# Altium PCB PCB1.PcbDoc
Units mil, origin at the board's own origin, x right, y up, seen from the top; angles counter-clockwise.
Board outline 6000 x 4000 mil, 2 copper layers (Top Layer, Bottom Layer); 70 components, 48 nets, 257 pads, 4 vias.
Unrouted connection lines stored in the file: 175.
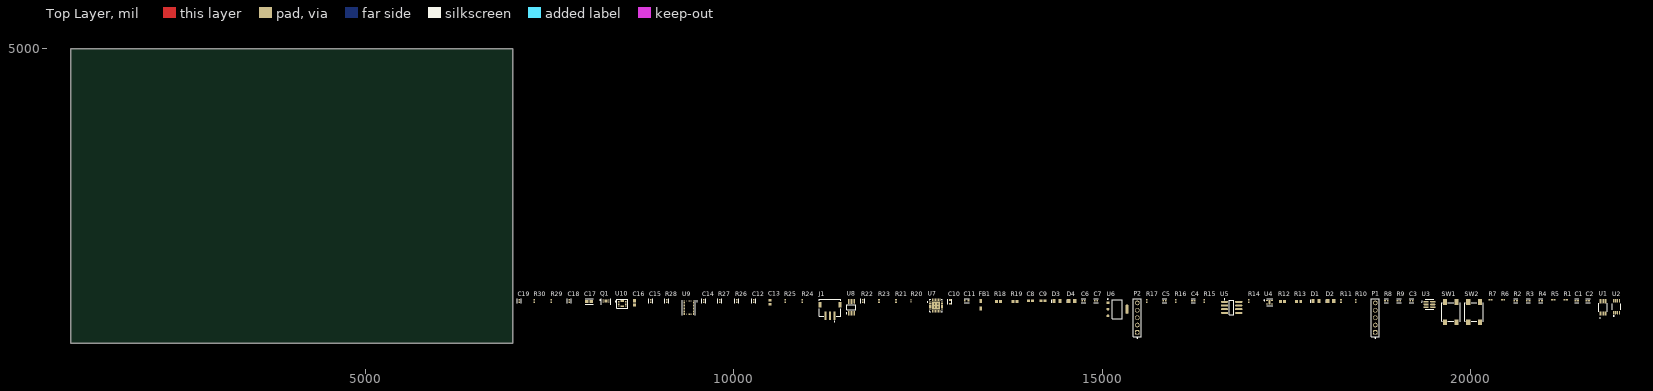
[diagram p0: Top Layer view]
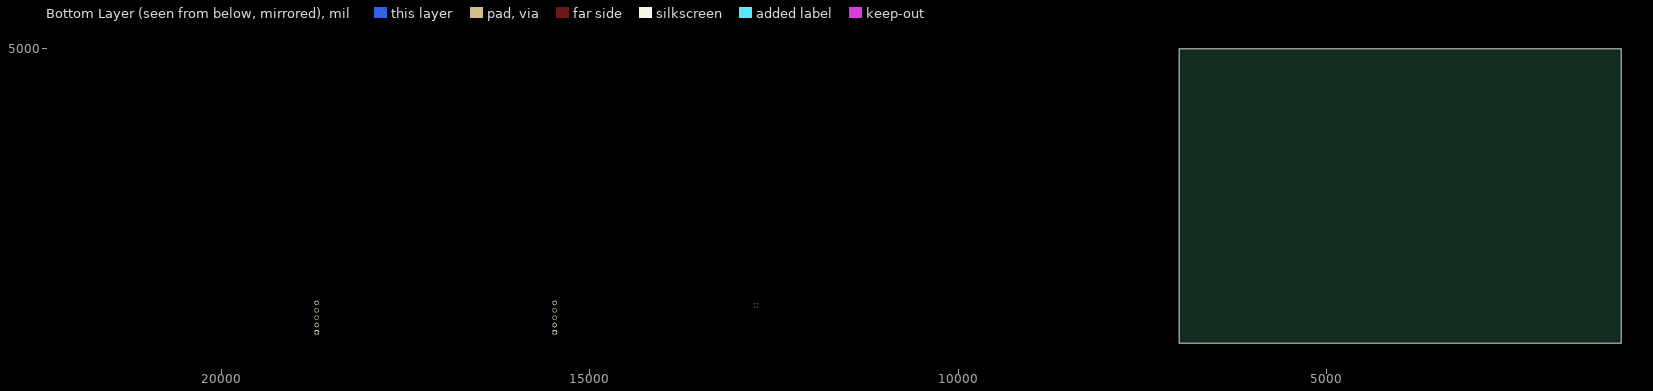
[diagram p1: Bottom Layer view, seen from below]

## Layer stack, top to bottom
Top Solder: solder mask 0.4, Solder Resist, Dk 3.5
Top Layer: signal copper 1.4
Dielectric 1: dielectric 12.6, FR-4, Dk 4.8
Bottom Layer: signal copper 1.4
Bottom Solder: solder mask 0.4, Solder Resist, Dk 3.5

## Board outline
1000,1000 7000,1000 7000,5000 1000,5000

## Design rules (kind name [scope] priority, off if disabled: settings)
Clearance [All] p1: gap=10 ignorepadtopadclearanceinfootprint=FALSE except(0: Arc-Hole Track-Hole SMDPad-Hole THPad-Hole Via-Hole Fill-Hole Poly-Hole Region-Hole Text-Hole)
PolygonConnect [All] p1: connectstyle=Relief reliefconductorwidth=10 reliefentries=4 polygonreliefangle="90 Angle" airgapwidth=10
RoutingVias [All] p1: holewidth=28 width=50 viastyle="Through Hole" minholewidth=28 minwidth=50 maxholewidth=28 maxwidth=50
SolderMaskExpansion [All] p1: expansion=4 istentingtop=FALSE
Width [All] p1: maxlimit=10 minlimit=10 preferedwidth=10
30 further rules are at their usual default settings.

## Components (designator, comment, footprint, x,y, rotation, side; value= is the part's Value field where it differs from the comment)
C1 "GRM155R71H104KE14D" FP-GRM155-0_05-IPC_B 21440,1580 r0 top
C2 "GRM155R71H104KE14D" FP-GRM155-0_05-IPC_B 21590,1580 r0 top
C3 "GRM155R71H104KE14D" FP-GRM155-0_05-IPC_B 19195,1580 r0 top
C4 "GRM155R71H104KE14D" FP-GRM155-0_05-IPC_B 16235,1580 r0 top
C5 "GRM155R71H104KE14D" FP-GRM155-0_05-IPC_B 15845,1580 r0 top
C6 "GRM155R71H104KE14D" FP-GRM155-0_05-IPC_B 14745,1580 r0 top
C7 "GRM155R71H104KE14D" FP-GRM155-0_05-IPC_B 14915,1580 r0 top
C8 "0603YC105JAT2A" CAPC1608X90X35NL15T15 14025,1580 r0 top
C9 "0603YC105JAT2A" CAPC1608X90X35NL15T15 14195,1580 r0 top
C10 "GCM188R71E105KA64D" FP-GCM188-0_1-MFG 12930,1565 r90 top
C11 "GCM188R71E105KA64D" FP-GCM188-0_1-MFG 13160,1580 r0 top
C12 "GRM155R71H104KE14D" FP-GRM155-0_05-IPC_B 10270,1575 r90 top
C13 "VJ0603Y222KXCAC" CAPC1608X92X38NL15T08 10490,1560 r90 top
C14 "GRM155R71H104KE14D" FP-GRM155-0_05-IPC_B 9590,1575 r90 top
C15 "GRM155R71H104KE14D" FP-GRM155-0_05-IPC_B 8870,1575 r90 top
C16 "0603YC105JAT2A" CAPC1608X90X35NL15T15 8650,1550 r90 top
C17 "GRM188R60J106ME47D" FP-GRM188-0_1-e0_2_0_55-IPC_A 8035,1570 r0 top
C18 "GRM155R71H104KE14D" FP-GRM155-0_05-IPC_B 7765,1575 r90 top
C19 "GRM155R71H104KE14D" FP-GRM155-0_05-IPC_B 7085,1575 r90 top
D1 "150080VS75000" WL-SMCW_0805_150080xx75000 17900,1575 r0 top
D2 "150080VS75000" WL-SMCW_0805_150080xx75000 18100,1575 r0 top
D3 "150080VS75000" WL-SMCW_0805_150080xx75000 14385,1575 r0 top
D4 "150080VS75000" WL-SMCW_0805_150080xx75000 14585,1575 r0 top
FB1 "742792011" WE-CBF_0805_L2W1.2H0.9_HC 13350,1525 r90 top
J1 "S3B-ZR-SM4A-TF(LF)(SN)" FP-S3B-ZR-SM4A-TF_LF_SN-MFG 11305,1485 r0 top
P1 "61300511121" 61300511121 18705,1350 r90 top
P2 "61300511121" 61300511121 15475,1350 r90 top
Q1 "CSD16301Q2" FP-CSD16301Q2-MFG 8265,1565 r0 top
R1 "RC0402JR-100RL" RESC1005X40X25NL05T10 21290,1595 r0 top value=0R
R2 "CRCW04024K70FKED" FP-CRCW0402-e3-IPC_B 20610,1580 r0 top
R3 "CRCW04024K70FKED" FP-CRCW0402-e3-IPC_B 20780,1580 r0 top
R4 "CRCW04024K70FKED" FP-CRCW0402-e3-IPC_B 20950,1580 r0 top
R5 "RC0402JR-100RL" RESC1005X40X25NL05T10 21120,1595 r0 top value=0R
R6 "RC0402JR-100RL" RESC1005X40X25NL05T10 20440,1595 r0 top value=0R
R7 "RC0402JR-100RL" RESC1005X40X25NL05T10 20270,1595 r0 top value=0R
R8 "CRCW04024K70FKED" FP-CRCW0402-e3-IPC_B 18855,1580 r0 top
R9 "CRCW04024K70FKED" FP-CRCW0402-e3-IPC_B 19025,1580 r0 top
R10 "RC0402JR-100RL" RESC1005X40X25NL05T10 18440,1575 r90 top value=0R
R11 "RC0402JR-100RL" RESC1005X40X25NL05T10 18240,1575 r90 top value=0R
R12 "ERA3AEB4020V" RESC1608X55X30ML20T20 17445,1570 r0 top
R13 "ERA3AEB4020V" RESC1608X55X30ML20T20 17665,1570 r0 top
R14 "RC0402JR-100RL" RESC1005X40X25NL05T10 16990,1575 r90 top value=0R
R15 "RC0402JR-100RL" RESC1005X40X25NL05T10 16385,1575 r90 top value=0R
R16 "RC0402JR-100RL" RESC1005X40X25NL05T10 15995,1575 r90 top value=0R
R17 "RC0402JR-100RL" RESC1005X40X25NL05T10 15605,1575 r90 top value=0R
R18 "ERA3AEB4020V" RESC1608X55X30ML20T20 13590,1570 r0 top
R19 "ERA3AEB4020V" RESC1608X55X30ML20T20 13815,1570 r0 top
R20 "RC0402FR-0710KL" RESC1005X40X25LL05T10 12405,1580 r90 top value=10kΩ
R21 "RC0402JR-100RL" RESC1005X40X25NL05T10 12200,1575 r90 top value=0R
R22 "CRCW04024K70FKED" FP-CRCW0402-e3-IPC_B 11750,1575 r90 top
R23 "RC0402JR-100RL" RESC1005X40X25NL05T10 11970,1575 r90 top value=0R
R24 "RC0402JR-100RL" RESC1005X40X25NL05T10 10930,1575 r90 top value=0R
R25 "RC0402JR-100RL" RESC1005X40X25NL05T10 10695,1575 r90 top value=0R
R26 "CRCW04024K70FKED" FP-CRCW0402-e3-IPC_B 10040,1575 r90 top
R27 "CRCW04024K70FKED" FP-CRCW0402-e3-IPC_B 9810,1575 r90 top
R28 "CRCW04024K70FKED" FP-CRCW0402-e3-IPC_B 9090,1575 r90 top
R29 "RC0402JR-100RL" RESC1005X40X25NL05T10 7520,1575 r90 top value=0R
R30 "RC0402JR-100RL" RESC1005X40X25NL05T10 7290,1575 r90 top value=0R
SW1 "430481025816" 430481025816 19730,1425 r90 top
SW2 "430481025816" 430481025816 20045,1425 r90 top
U1 "TCA9536DGKR" SOP65P490X110-8N 21795,1490 r90 top
U2 "TMP275AIDGKR" FP-DGK0008A-IPC_C 21980,1500 r90 top
U3 "TMP101NA/3K" FP-DBV0006A-IPC_A 19440,1530 r0 top
U4 "STTS22HTR" FP-UDFN-6L-DM00423052-MFG 17270,1560 r0 top
U5 "LTC1710IS8#TRPBF" LT-S8-8_M 16755,1490 r0 top
U6 "AMS1117-3.3" FP-AMS1117-IPC_C 15205,1465 r0 top
U7 "MPU-6050" IS-QFN-24_V 12745,1515 r0 top
U8 "MAX6650EUB+" MAXM-U10+2_N 11595,1490 r90 top
U9 "BNO055" FP-BNO055-MFG 9390,1485 r0 top
U10 "LSM6DSOTR" FP-LGA-14L-DM00249496-MFG 8485,1540 r0 top

## Footprints (in the part's own frame and the unit in brackets; to place one, negate y for a bottom-side part, rotate by r counter-clockwise, add the part's x,y. Pads: shape width x height; smd on the part's side, far side on the other; paste and mask are expansions set on the pad)
61300511121 [mm] "Pin Header, pitch 2.54 mm, THT, Vertical, single row, 5p"
  rrect50% 1.6x1.6 hole 1.1: 1(-5.08,0)
  round 1.6 hole 1.1: 2(-2.54,0) 3(0,0) 4(2.54,0) 5(5.08,0)
  silkscreen extent -7.07,-1.35 6.5,1.35, body extent -6.35,-1.27 6.35,1.27, height 8.57
430481025816 [mm] "SMD Tact Switch, body 6x6mm"
  rect 2x1.4 smd: A1(-3.5,2) A2(3.5,2) B1(-3.5,-2) B2(3.5,-2)
  silkscreen extent -3.2,-3.2 3.2,3.2, body extent -4,-3.1 4,3.1, height 2.5
CAPC1608X90X35NL15T15 [mm] "Chip Capacitor, 2-Leads, Body 1.60x0.81mm, IPC Medium Density"
  rect 1.05x1 smd: 1(-0.75,0) 2(0.75,0)
  body extent -0.88,-0.48 0.87,0.48, height 0.9
CAPC1608X92X38NL15T08 [mm] "Chip Capacitor, 2-Leads, Body 1.60x0.80mm, IPC Medium Density"
  rect 0.85x1 smd: 1(-0.675,0) 2(0.675,0)
  body extent -0.87,-0.48 0.87,0.47, height 0.92
FP-AMS1117-IPC_C [mm]
  rect 1.004x0.872 smd paste+0 mask+0: 1(-3.295,2.29)
  rrect100% 1.004x0.872 smd paste+0 mask+0: 2(-3.295,0) 3(-3.295,-2.29)
  rrect87% 1.004x3.182 smd paste+0 mask+0: 4(3.295,0)
  silkscreen extent -3.42,-3.25 1.75,3.62, body extent -3.9,-3.35 3.9,3.35, height 0.25
FP-BNO055-MFG [mm]
  rect 0.475x0.35 smd paste+0 mask-1000: 1(1.562,2.25) 6(-1.562,2.25) 7(-1.562,1.75) 8(-1.562,1.25) 9(-1.562,0.75) 10(-1.562,0.25) 11(-1.562,-0.25) 12(-1.562,-0.75) 13(-1.562,-1.25) 14(-1.562,-1.75) 15(-1.562,-2.25) 20(1.562,-2.25) 21(1.562,-1.75) 22(1.562,-1.25) 23(1.562,-0.75) 24(1.562,-0.25) 25(1.562,0.25) 26(1.562,0.75) 27(1.562,1.25) 28(1.562,1.75)
  rect 0.25x0.475 smd paste+0 mask-1000: 2(0.75,2.312) 3(0.25,2.312) 4(-0.25,2.312) 5(-0.75,2.312) 16(-0.75,-2.312) 17(-0.25,-2.312) 18(0.25,-2.312) 19(0.75,-2.312)
  silkscreen extent -2.25,-2.65 2.88,2.65, body extent -2.45,-3.15 2.45,3.15, height 0.25
FP-CRCW0402-e3-IPC_B [mil]
  rect 22.37x22.54 smd paste+0 mask+0: 1(-17.8,0) 2(17.8,0)
  silkscreen extent -29,-27 29,27, body extent -35,-17 35,17, height 10
FP-CSD16301Q2-MFG [mm]
  rrect33% 0.45x0.3 smd paste+0 mask+0: 1(-0.975,0.65) 2(-0.975,0) 3(-0.975,-0.65) 4(0.975,-0.65) 5(0.975,0) 6(0.975,0.65)
  rrect33% 0.75x0.3 smd paste-1000 mask+0: 7(0.095,-0.65)
  rrect11% 1x0.95 smd paste-1000 mask+0: 8(0,0.325)
  silkscreen extent -2.12,-1.05 1.6,1.05, body extent -1.3,-1.15 1.3,1.15, height 0.25
FP-DBV0006A-IPC_A [mm]
  rect 1.805x0.61 smd paste+0 mask+0: 1(-1.15,0.95)
  rrect100% 1.805x0.61 smd paste+0 mask+0: 2(-1.15,0) 3(-1.15,-0.95) 4(1.15,-0.95) 5(1.15,0) 6(1.15,0.95)
  silkscreen extent -2.73,-1.7 1.4,1.7, body extent -2.55,-1.95 2.55,1.95, height 0.25
FP-DGK0008A-IPC_C [mm]
  rect 1.257x0.418 smd paste+0 mask+0: 1(-2.051,0.975)
  rrect100% 1.257x0.418 smd paste+0 mask+0: 2(-2.051,0.325) 3(-2.051,-0.325) 4(-2.051,-0.975) 5(2.051,-0.975) 6(2.051,-0.325) 7(2.051,0.325) 8(2.051,0.975)
  silkscreen extent -3.35,-1.5 1.05,1.5, body extent -2.78,-1.6 2.78,1.6, height 0.25
FP-GCM188-0_1-MFG [mm]
  rect 0.65x0.7 smd paste+0 mask+0: 1(-0.675,0) 2(0.675,0)
  silkscreen extent -0.85,-0.75 0.85,0.75, body extent -1.1,-0.55 1.1,0.55, height 0.25
FP-GRM155-0_05-IPC_B [mil]
  rect 24.23x22.54 smd paste+0 mask+0: 1(-16.87,0) 2(16.87,0)
  silkscreen extent -29,-27 29,27, body extent -35,-17 35,17, height 10
FP-GRM188-0_1-e0_2_0_55-IPC_A [mil]
  rect 47.57x39.85 smd paste+0 mask+0: 1(-31.57,0) 2(31.57,0)
  silkscreen extent -55,-36 55,36, body extent -75,-40 75,40, height 10
FP-LGA-14L-DM00249496-MFG [mm]
  rect 0.575x0.35 smd paste+0 mask+0: 1(-1.162,0.75) 2(-1.162,0.25) 3(-1.162,-0.25) 4(-1.162,-0.75) 8(1.162,-0.75) 9(1.162,-0.25) 10(1.162,0.25) 11(1.162,0.75)
  rect 0.35x0.575 smd paste+0 mask+0: 5(-0.5,-0.913) 6(0,-0.913) 7(0.5,-0.913) 12(0.5,0.913) 13(0,0.913) 14(-0.5,0.913)
  silkscreen extent -2.5,-1.58 1.83,1.58, body extent -2.05,-1.8 2.05,1.8, height 0.25
FP-S3B-ZR-SM4A-TF_LF_SN-MFG [mm]
  rect 0.7x2.9 smd paste+0 mask+0: 1(1.5,-2.75) 2(0,-2.75) 3(-1.5,-2.75)
  rect 1.1x1.9 smd paste+0 mask+0: 4(-3.45,1.05) 5(3.45,1.05)
  silkscreen extent -3.75,-4.9 3.75,3, body extent -4.1,-4.3 4.1,3.1, height 0.25
FP-UDFN-6L-DM00423052-MFG [mm]
  rect 0.7x0.27 smd paste+0 mask-1000: 1(-0.89,0.65) 2(-0.89,0) 3(-0.89,-0.65) 4(0.89,-0.65) 5(0.89,0) 6(0.89,0.65)
  rect 0.65x1.45 smd paste+0 mask-1000: 7(0,0)
  silkscreen extent -1.95,-1.25 1.02,1.25, body extent -1.34,-1.12 1.34,1.12, height 0.25
IS-QFN-24_V [mm] "QFN, 24-Leads, Body 4x4mm, Pitch 0.5mm, Thermal Pad 2.7x2.6mm"
  rect 0.8x0.35 smd: 1(-2,1.25) 2(-2,0.75) 3(-2,0.25) 4(-2,-0.25) 5(-2,-0.75) 6(-2,-1.25) 13(2,-1.25) 14(2,-0.75) 15(2,-0.25) 16(2,0.25) 17(2,0.75) 18(2,1.25)
  rect 0.35x0.85 smd mask+0.102: 7(-1.25,-1.975) 8(-0.75,-1.975) 9(-0.25,-1.975) 10(0.25,-1.975) 11(0.75,-1.975) 12(1.25,-1.975) 19(1.25,1.975) 20(0.75,1.975) 21(0.25,1.975) 22(-0.25,1.975) 23(-0.75,1.975) 24(-1.25,1.975)
  rect 2.7x2.6 smd: 25(0,0)
  silkscreen extent -3.07,-2.15 2.15,2.15, body extent -2,-2 2,2, height 0.95
LT-S8-8_M [mm] "SOIC, 8-Leads, Body 5x4mm, Pitch 1.27mm, IPC Low Density"
  oval 2.5x0.7 smd: 1(-2.45,1.905) 2(-2.45,0.635) 3(-2.45,-0.635) 4(-2.45,-1.905) 5(2.45,-1.905) 6(2.45,-0.635) 7(2.45,0.635) 8(2.45,1.905)
  silkscreen extent -2.57,-2.5 0.8,2.93, body extent -2,-2.5 2,2.5, height 1.76
MAXM-U10+2_N [mm] "SOP, 10-Leads, Body 3x3mm, Pitch 0.5mm, IPC Medium Density"
  oval 1.65x0.3 smd: 1(-2.05,1) 2(-2.05,0.5) 3(-2.05,0) 4(-2.05,-0.5) 5(-2.05,-1) 6(2.05,-1) 7(2.05,-0.5) 8(2.05,0) 9(2.05,0.5) 10(2.05,1)
  silkscreen extent -2.17,-1.52 0.82,1.82, body extent -1.55,-1.55 1.55,1.55, height 1.1
RESC1005X40X25LL05T10 [mm] "Chip Resistor, 2-Leads, Body 1.00x0.50mm, IPC High Density"
  rect 0.5x0.45 smd: 1(-0.375,0) 2(0.375,0)
  body extent -0.53,-0.27 0.53,0.28, height 0.4
RESC1005X40X25NL05T10 [mm] "Chip Resistor, 2-Leads, Body 1.00x0.50mm, IPC Medium Density"
  rect 0.6x0.55 smd: 1(-0.425,0) 2(0.425,0)
  body extent -0.53,-0.27 0.53,0.28, height 0.4
RESC1608X55X30ML20T20 [mm] "Chip Resistor, 2-Leads, Body 1.60x0.80mm, IPC Low Density"
  rect 1x1.1 smd: 1(-0.7,0) 2(0.7,0)
  body extent -0.9,-0.5 0.9,0.5, height 0.55
SOP65P490X110-8N [mm]
  rrect25% 1.47x0.48 smd mask+0: 1(-2.15,0.975) 2(-2.15,0.325) 3(-2.15,-0.325) 4(-2.15,-0.975) 5(2.15,-0.975) 6(2.15,-0.325) 7(2.15,0.325) 8(2.15,0.975)
  silkscreen extent -3.72,-1.54 1.5,1.54, body extent -2.45,-1.5 2.45,1.5, height 1.1
WE-CBF_0805_L2W1.2H0.9_HC [mm] "SMD EMI Suppression Ferrite  Bead, body 2.00x1.20mm"
  rect 1.4x1 smd: 1(-1.3,0) 2(1.3,0)
  body extent -1,-0.6 1,0.6, height 0.9
WL-SMCW_0805_150080xx75000 [mm] "SMD Mono-color Chip LED, body 2.0x1.25mm"
  rect 1.1x1.3 smd: 1(-1.05,0) 2(1.05,0)
  silkscreen extent -2,-0.6 -1.8,0.6, body extent -1,-0.63 1,0.62, height 0.7

## Part data
C1 C2 C3 C4 C5 C6 C7 C12 C14 C15 C18 C19: library part CMP-2008-04639-2, "Chip Multilayer Ceramic Capacitors for General Purpose, 0402, 0.10uF, X7R, 15%, 10%, 50V", Capacitance=100nF, Case Code (Imperial)=0402, Case Code (Metric)=1005, Dielectric=X7R, Dielectric Material=Ceramic, Max Operating Temperature=125°C, Min Operating Temperature=-55°C, Package Quantity=10000, Tolerance=10%, Voltage=50V, Case/Package=0402, Depth=0.5mm, Dissipation Factor=0.025%, Height=0.5mm, Lead Free="Lead Free", Length=1mm, Material=Ceramic, Mount="Surface Mount", Packaging="Tape and Reel", REACH SVHC="No SVHC", Resistor Type=Ceramic, Termination=SMD/SMT, Thickness=0.022inch, Voltage Rating=50V, Voltage Rating (DC)=50V, Weight=0.000212oz, Width=0.5mm
C8 C9 C16: library part CMP-1035-02736-2, Manufacturer="AVX Interconnect / Elco", Part Number=0603YC105JAT2A
C10 C11: library part CMP-2006-02363-4, Capacitance=1µF, Case Code (Imperial)=0603, Case Code (Metric)=1608, Dielectric=X7R, Manufacturer Lifecycle Status="IN PRODUCTION", Max Operating Temperature=125°C, Min Operating Temperature=-55°C, Ratings=AEC-Q200, Tolerance=10%, Voltage=25V, Case/Package=0603, Depth=800µm, Height=800µm, Lead Free="Lead Free", Length=1.6mm, Lifecycle Status=Production, Material=Ceramic, Mount="Surface Mount", NexarPartId=18909256, Packaging="Cut Tape", Radiation Hardening=No, REACH SVHC="No SVHC", RoHS=Compliant, Schedule B="8532240020, 8532240020", Termination=SMD/SMT, Thickness=889µm, Voltage Rating=25V, Voltage Rating (DC)=25V, Weight=6.293594mg, Width=787.4µm
C13: library part CMP-2006-01127-1, Manufacturer=Vitramon, Part Number=VJ0603Y222KXCAC
C17: library part CMP-2006-02792-2, "Chip Multilayer Ceramic Capacitors for General Purpose, 0603, 10uF, X5R, 15%, 20%, 6.3V", Capacitance=10uF, Case Code (Imperial)=0603, Case Code (Metric)=1608, Dielectric=X5R, Max Operating Temperature=85°C, Min Operating Temperature=-55°C, Package Quantity=4000, Tolerance=20%, Voltage=6.3V, Case/Package=0603, Depth=0.8mm, Height=0.8mm, Lead Free="Lead Free", Length=1.6mm, Material=Ceramic, Mount="Surface Mount", Packaging="Tape and Reel", Radiation Hardening=No, REACH SVHC="No SVHC", Termination=SMD/SMT, Thickness=0.035inch, Voltage Rating=6.3V, Voltage Rating (DC)=6.3V, Width=0.031inch
D1 D2 D3 D4: library part CMP-1426-00009-6, "WL-SMCW SMT Mono-Color Chip LED Waterclear", Case Code (Imperial)=0805, Case Code (Metric)=2012, Color=Green, Forward Current=100mA, Forward Voltage=2V, Max Junction Temperature (Tj)=95°C, Max Operating Temperature=85°C, Max Reverse Voltage (DC)=5V, Min Operating Temperature=-40°C, Power Dissipation=72mW, Test Current=20mA, Case/Package=0805, Dominant Wavelength=570nm, Height=700µm, Length=2mm, Lens Style="Clear, Rectangular", Luminous Intensity=40mcd, Mount="Surface Mount", Packaging="Tape and Reel", Peak Wavelength=572nm, REACH SVHC=Unknown, Reverse Voltage=5V, RoHS=Compliant, Viewing Angle=140°, Wavelength=570nm, Width=1.25mm
FB1: library part CMP-0220-00043-2, Current Rating=3A, Max Operating Temperature=125°C, Min Operating Temperature=-55°C, Resistance=30mΩ, Height=900µm, Impedance=10Ω, Length=2mm, NexarPartId=22803106, Packaging="Cut Tape (CT)", RoHS=Compliant, Width=1.2mm
J1: library part CMP-17439-000744-1, "CONN HEADER SMD R/A 3POS 1.5MM", Color=Natural, Contact Resistance=30mR, Current Rating=1A, Flammability Rating="UL94 V-0", Housing Color=Beige, Max Operating Temperature=85°C, Max Voltage Rating (AC)=50V, Min Operating Temperature=-25°C, Connector Type=Header, Contact Finish - Mating=TIN, Contact Material=Brass, Contact Plating=Copper, Contact Shape=Circular, Contact Type="Male Pin", Depth=6.5mm, Fastening Type=Detent, Gender=Male, Height=7.2mm, Housing Material=Polyamide, Insulation Color=Natural, Insulation Material=Nylon, Lead Free="Lead Free", Length=7.5mm, Max Current Rating=1A, Mount="Surface Mount", Number of Contacts=3, Number of Positions=3, Number of Rows=1, Orientation="Right Angle", Packaging="Tape and Reel", Pitch=1.5mm, Series=ZH, Termination=Solder, Voltage Rating=50V, Width=3.5mm
P1 P2: library part CMP-1502-01068-4, "THT Vertical Pin Header WR-PHD, Pitch 2.54 mm, Single Row, 5 pins", Color=Black, Contact Resistance=20mΩ, Current Rating=3A, Max Operating Temperature=105°C, Min Operating Temperature=-40°C, Operating Supply Voltage=250V, Connector Type="Male Pin", Contact Material=Gold, Contact Mating Length=5.9944mm, Contact Plating=Gold, Gender=Male, Height=8.89mm, Lead Free="Lead Free", Lead Pitch=2.54mm, Mount="Through Hole", Number of Contacts=5, Number of Pins=5, Number of Positions=5, Number of Rows=1, Orientation=Vertical, Packaging=Bulk, Pitch=2.54mm, RoHS=Compliant, Termination=Solder, Voltage Rating=250V
Q1: library part CMP-04962-000001-1, "MOSFET N-CH 25V 6-SON", Continuous Drain Current=8.2A, Drain To Source Breakdown Voltage=25V, Drain To Source Resistance=23mΩ, Gate To Source Voltage=+10/-8V, Input Capacitace At Vds="260pF @ 12.5V", Manufacturer="Texas Instruments", Max Forward Diode Voltage=1V, Max Junction Temp=+150°C, Package=0, Power Dissipation=2.5W, Pulse Drain Current=85A, Temperature="-55°C to +150°C", Temperature Range Low=-55°C, Typ Forward Diode Voltage=0.8V, Automotive=No, Category=Trans, ComponentLink2Description=Datasheet, ComponentLink2URL=http://www.ti.com/lit/ds/symlink/csd16301q2.pdf, Depletion Mode=False, Device Class L1="Discrete Semiconductors", Device Class L2=Transistors, Device Class L3=MOSFETs, Digikey Description="MOSFET N-CH 25V 6-SON", Drain To Source Voltage=25V, Gate Charge At Vgs="2nC @ 4.5V", Height=0.8mm, Lead Free=Yes, Manufacturer Part Number=CSD16301Q2, Mouser Description="MOSFET N-Channel NexFET Power MOSFET", Number Of Channels=1, Number Of N Channels=1, Octopart=https://octopart.com/csd16301q2-texas+instruments-12088257, Reverse Recovery Charge=5.1nC, Reverse Recovery Time=11ns, RoHS=TRUE, Rthja Max=65°C/W, Standoff Height=0mm, Temperature Range High=+150°C, Threshold Vgs Max=1.55V, Threshold Vgs Min=0.9V, Transconductance=16.5S, Turn Off Delay Time=4.1ns, Turn On Delay Time=2.7ns
R1 R5 R6 R7 R10 R11 R14 R15 R16 R17 R21 R23 R24 R25 R29 R30: library part CMP-2002-06970-1, Manufacturer=Yageo, Part Number=RC0402JR-100RL
R2 R3 R4 R8 R9 R22 R26 R27 R28: library part CMP-2002-00051-3, "RES Thick Film, 4.7kΩ, 1%, 0.063W, 100ppm/°C, 0402", Case Code (Imperial)=0402, Case Code (Metric)=1005, Max Operating Temperature=155°C, Max Power Dissipation=63mW, Min Operating Temperature=-55°C, Package Quantity=10, Resistance=4.7kR, Temperature Coefficient=100ppm/°C, Tolerance=1%, Voltage Rating=50V, Case/Package=0402, Composition="Thick Film", Contact Plating=Tin, Depth=0.5mm, Features="Automotive AEC-Q200", Height=0.35mm, Lead Free="Lead Free", Length=1mm, Military Standard=Not, Mount="Surface Mount", Number of Terminations=2, Packaging="Tape and Reel", Power Rating=63mW, Radiation Hardening=No, Termination=SMD/SMT, Voltage Rating (DC)=50V, Weight=2.3E-05oz, Width=0.5mm
R12 R13 R18 R19: library part CMP-2000-00056-1, Manufacturer=Panasonic, Part Number=ERA3AEB4020V
R20: library part CMP-2002-07353-1, Case Code (Imperial)=0402, Manufacturer="Yageo / Phycomp", Max Operating Temperature=155°C, Min Operating Temperature=-55°C, Power Dissipation=62.5mW, Power Rating=63mW, Supplier Part Number=2421890, Temperature Coefficient=100ppm/°C, Tolerance=1%, Voltage Rating=50V, Case Code (Metric)=0402, Case/Package=0402, Category="Chip SMD Resistors", China RoHS=Non-Compliant, ComponentLink1Description=https://datasheet.octopart.com:443/RC0402FR-0710KL-Yageo-datasheet-175887523.pdf?src-supplier=Newark, ComponentLink1URL=https://datasheet.octopart.com:443/RC0402FR-0710KL-Yageo-datasheet-175887523.pdf?src-supplier=Newark, ComponentLink2Description=https://datasheet.octopart.com:443/RC0402FR-0710KL-Yageo-datasheet-12531192.pdf?src-supplier=Newark, ComponentLink2URL=https://datasheet.octopart.com:443/RC0402FR-0710KL-Yageo-datasheet-12531192.pdf?src-supplier=Newark, ComponentLink3Description=https://datasheet.octopart.com:443/RC0402FR-0710KL-Yageo-datasheet-8324527.pdf?src-supplier=Newark, ComponentLink3URL=https://datasheet.octopart.com:443/RC0402FR-0710KL-Yageo-datasheet-8324527.pdf?src-supplier=Newark, ComponentLink4Description=https://datasheet.octopart.com:443/RC0402FR-0710KL-Yageo-datasheet-10408619.pdf?src-supplier=element14+APAC, ComponentLink4URL=https://datasheet.octopart.com:443/RC0402FR-0710KL-Yageo-datasheet-10408619.pdf?src-supplier=element14+APAC, ComponentLink5Description=https://datasheet.octopart.com:443/RC0402FR-0710KL-Yageo-datasheet-62067350.pdf?src-supplier=element14+APAC, ComponentLink5URL=https://datasheet.octopart.com:443/RC0402FR-0710KL-Yageo-datasheet-62067350.pdf?src-supplier=element14+APAC, ComponentLink6Description=https://datasheet.octopart.com:443/RC0402FR-0710KL-Yageo-datasheet-21426659.pdf?src-supplier=element14+APAC, ComponentLink6URL=https://datasheet.octopart.com:443/RC0402FR-0710KL-Yageo-datasheet-21426659.pdf?src-supplier=element14+APAC, ComponentLink7Description=https://datasheet.octopart.com:443/RC0402FR-0710KL-Yageo-datasheet-164759695.pdf?src-supplier=Upverter, ComponentLink7URL=https://datasheet.octopart.com:443/RC0402FR-0710KL-Yageo-datasheet-164759695.pdf?src-supplier=Upverter, ComponentLink8Description=https://datasheet.octopart.com:443/RC0402FR-0710KL-Yageo-datasheet-103092701.pdf?src-supplier=Upverter, ComponentLink8URL=https://datasheet.octopart.com:443/RC0402FR-0710KL-Yageo-datasheet-103092701.pdf?src-supplier=Upverter, ComponentLink9Description=https://sigma.octopart.com:443/138820526/technical_drawing/Yageo-RC0402FR-0710KL.pdf?src-supplier=Upverter, ComponentLink9URL=https://sigma.octopart.com:443/138820526/technical_drawing/Yageo-RC0402FR-0710KL.pdf?src-supplier=Upverter, ComponentLink10Description=https://datasheet.octopart.com:443/RC0402FR-0710KL-Yageo-datasheet-98239111.pdf?src-supplier=Upverter, ComponentLink10URL=https://datasheet.octopart.com:443/RC0402FR-0710KL-Yageo-datasheet-98239111.pdf?src-supplier=Upverter, ComponentLink11Description=https://datasheet.octopart.com:443/RC0402FR-0710KL-Yageo-datasheet-68298067.pdf?src-supplier=Upverter, ComponentLink11URL=https://datasheet.octopart.com:443/RC0402FR-0710KL-Yageo-datasheet-68298067.pdf?src-supplier=Upverter, ComponentLink12Description=https://datasheet.octopart.com:443/RC0402FR-0710KL-Yageo-datasheet-68297981.pdf?src-supplier=Upverter, ComponentLink12URL=https://datasheet.octopart.com:443/RC0402FR-0710KL-Yageo-datasheet-68297981.pdf?src-supplier=Upverter, ComponentLink13Description=https://datasheet.octopart.com:443/RC0402FR-0710KL-Yageo-datasheet-141435361.pdf?src-supplier=Upverter, ComponentLink13URL=https://datasheet.octopart.com:443/RC0402FR-0710KL-Yageo-datasheet-141435361.pdf?src-supplier=Upverter, ComponentLink14Description=https://datasheet.octopart.com:443/RC0402FR-0710KL-Yageo-datasheet-12509768.pdf?src-supplier=Upverter, ComponentLink14URL=https://datasheet.octopart.com:443/RC0402FR-0710KL-Yageo-datasheet-12509768.pdf?src-supplier=Upverter, ComponentLink15Description=https://datasheet.octopart.com:443/RC0402FR-0710KL-Yageo-datasheet-8329306.pdf?src-supplier=element14, ComponentLink15URL=https://datasheet.octopart.com:443/RC0402FR-0710KL-Yageo-datasheet-8329306.pdf?src-supplier=element14, ComponentLink16Description=https://datasheet.octopart.com:443/RC0402FR-0710KL-Yageo-datasheet-505231.pdf?src-supplier=element14, ComponentLink16URL=https://datasheet.octopart.com:443/RC0402FR-0710KL-Yageo-datasheet-505231.pdf?src-supplier=element14, ComponentLink17Description=https://datasheet.octopart.com:443/RC0402FR-0710KL-Yageo-datasheet-175423674.pdf?src-supplier=SOS+electronic, ComponentLink17URL=https://datasheet.octopart.com:443/RC0402FR-0710KL-Yageo-datasheet-175423674.pdf?src-supplier=SOS+electronic, ComponentLink18Description=https://datasheet.octopart.com:443/RC0402FR-0710KL-Yageo-datasheet-137700087.pdf?src-supplier=Future+Electronics, ComponentLink18URL=https://datasheet.octopart.com:443/RC0402FR-0710KL-Yageo-datasheet-137700087.pdf?src-supplier=Future+Electronics, ComponentLink19Description=https://datasheet.octopart.com:443/RC0402FR-0710KL-Yageo-datasheet-8324255.pdf?src-supplier=Future+Electronics, ComponentLink19URL=https://datasheet.octopart.com:443/RC0402FR-0710KL-Yageo-datasheet-8324255.pdf?src-supplier=Future+Electronics, ComponentLink20Description=https://datasheet.octopart.com:443/RC0402FR-0710KL-Yageo-datasheet-79472498.pdf?src-supplier=Megastar, ComponentLink20URL=https://datasheet.octopart.com:443/RC0402FR-0710KL-Yageo-datasheet-79472498.pdf?src-supplier=Megastar, ComponentLink21Description=https://datasheet.octopart.com/RC0402FR-0710KL-Yageo-datasheet-73766026.pdf, ComponentLink21URL=https://datasheet.octopart.com/RC0402FR-0710KL-Yageo-datasheet-73766026.pdf, ComponentLink22Description=http://sigma.octopart.com:80/conflict_mineral_statement/Yageo-company-3.pdf?src-supplier=Compliance+Statements, ComponentLink22URL=http://sigma.octopart.com:80/conflict_mineral_statement/Yageo-company-3.pdf?src-supplier=Compliance+Statements, ComponentLink23Description=http://sigma.octopart.com:80/rohs_statement/Yageo-company-2.pdf?src-supplier=Compliance+Statements, ComponentLink23URL=http://sigma.octopart.com:80/rohs_statement/Yageo-company-2.pdf?src-supplier=Compliance+Statements, Composition="Thick Film", Depth=500µm, Height=350µm, Lead Free="Lead Free", Lead Pitch=200µm, Length=1mm, Lifecycle Status=Production, Manufacturer Part Number=RC0402FR-0710KL, Military Standard=Not, Mounting Technology="Surface Mount", Number of Terminals=2, Number of Terminations=2, Packaging="Tape & Reel", Part Number=RC0402FR-0710KL, Pins=2, REACH SVHC=Yes, RoHS=Compliant, Schedule B="8533210045, 8533210045|8533210045|8533210045|8533210045|8533210045|8533210045|8533210045|8533210045|8533210045|8533210045|8533210045|8533210045|8533210045|8533210045, 8533210045|8533210045|8533210045|8533210045|8533210045|8533210045|8533210045|8533210045|8533210045|8533210045|8533210045|8533210045|8533210045|8533210045|8533210045, 8533210045|8533210045|8533210045|8533210045|8533210045|8533210045|8533210045|8533210045|8533210045|8533210045|8533210045|8533210045|8533210045|8533210045|8533210045|8533210045", Stock=1970000, Supplier=Farnell, Termination=SMD/SMT, Voltage Rating (DC)=50V, Width=500µm, Working Voltage=50V
SW1 SW2: library part CMP-1452-00025-9, "Switch Tactile Spst-no 0.05A 12V", Color=Black, Contact Current Rating=50mA, Contact Resistance=100mΩ, Insulation Resistance=100MΩ, Max Operating Temperature=85°C, Min Operating Temperature=-40°C, Operating Force=160N, Voltage Rating=12V, Actuator Length=500µm, Actuator Material="Liquid Crystal Polymer, Polymer", Contact Material="Stainless Steel, Steel", Contact Plating=Silver, Current Rating=50mA, Height=2.5mm, Illumination Type="Illuminated, Non-Illuminated", Lead Free="Lead Free", Length=6.2mm, Life (Cycles)=1Mcycles, Mechanical Life=1Mcycles, Mount="Surface Mount", Packaging="Tape and Reel", REACH SVHC=No, RoHS=Compliant, Switch Function=Off-Mom, Switch Travel=250µm, Termination=SMD/SMT, Throw Configuration=SPST, Voltage Rating (DC)=12V, Width=6.2mm
U1: "Remote 4-Bit IÂ²C and SMBus I/O expander with configuration register and interrupt", Package=None, Check_prices=https://www.snapeda.com/parts/TCA9536DGKR/Texas+Instruments/view-part/?ref=eda, MF="Texas Instruments", MP=TCA9536DGKR, SnapEDA_Link=https://www.snapeda.com/parts/TCA9536DGKR/Texas+Instruments/view-part/?ref=snap
U2: library part CMP-04948-000056-1, "SENSOR DIGITAL -40C-125C 8VSSOP", Case/Package=VSSOP, Max Operating Temperature=125°C, Max Supply Voltage=5.5V, Min Operating Temperature=-40°C, Min Supply Voltage=2.7V, Nominal Supply Current=410uA, Operating Supply Current=85uA, Package Quantity=2500, Quiescent Current=50uA, Contact Plating=Gold, Interface=I2C, Lead Free="Lead Free", Max Supply Voltage (DC)=5.5V, Min Supply Voltage (DC)=2.7V, Mount="Surface Mount", Number of Bits=12, Number of Pins=8, Output Type=Digital, Packaging="Tape and Reel", Radiation Hardening=No, REACH SVHC="No SVHC", Resolution=12b, RoHS Compliant=Yes, Series=-, Supply Current=410uA
U3: library part CMP-04948-000039-1, "SENSOR DIGITAL -55C-125C SOT23-6", Case/Package=SOT-23-6, Max Operating Temperature=125°C, Max Supply Voltage=5.5V, Min Operating Temperature=-55°C, Min Supply Voltage=2.7V, Operating Supply Current=75uA, Output Current=4mA, Package Quantity=3000, Quiescent Current=45uA, Contact Plating=Gold, Interface=I2C, Lead Free="Lead Free", Max Supply Voltage (DC)=5.5V, Min Supply Voltage (DC)=2.7V, Mount="Surface Mount", Number of Bits=12, Output Type=I2C, Packaging="Tape and Reel", Radiation Hardening=No, Resolution=12b, RoHS Compliant=Yes, Series=TMP101
U4: library part CMP-12184-000002-1, "LOW-VOLTAGE, ULTRA-LOW-POWER, 0.", Manufacturer=STMicroelectronics, Max Supply Voltage=3.6V, Min Supply Voltage=1.5V, Operating Supply Current=1.75-120uA, Package=UDFN-6L-DM00423052, Temperature="-40°C to +125°C", Temperature Range High=+125°C, Temperature Range Low=-40°C, Automotive=No, Category=IC, ComponentLink2Description=Datasheet, ComponentLink2URL=https://www.st.com/resource/en/datasheet/stts22h.pdf, Device Class L1=Sensors, Device Class L2="Temperature and Humidity Sensors", Device Class L3=unset, Digikey Description="LOW-VOLTAGE, ULTRA-LOW-POWER, 0.", Height=0.55mm, Interface=I2C,SMBus, Lead Free=Yes, Manufacturer Part Number=STTS22HTR, Mouser Description="Low-voltage, ultra-low-power, 0.5 ï¿½C accuracy Iï¿½C/SMBus 3.0 temperature sensor", Octopart=https://octopart.com/stts22htr-stmicroelectronics-103417944, Resolution=16bits, RoHS=TRUE, Sensor Output=I2C,SMBus, Standoff Height=0mm
U5: library part CMP-0479-00585-1, "Control Up to 6 Peripherals on Same Bus, 2.7 to 5.5 V Vin, 8-pin SOIC (S8-8), -40 to 85 degC, Pb-Free, Tape and Reel", Manufacturer="Linear Technology", ComponentLink1Description="Manufacturer URL", ComponentLink1URL=http://www.linear.com/, ComponentLink2Description=Datasheet, ComponentLink2URL=http://cds.linear.com/docs/en/datasheet/1710f.pdf, ComponentLink3Description="Package Specification", ComponentLink3URL=http://cds.linear.com/docs/en/packaging/05081610_G_SO8.pdf, Mounting Technology="Surface Mount", PackageDescription="8-Pin Plastic Small Outline (Narrow .150 Inch), Body 4.9 x 3.9 mm, Pitch 1.27 mm", PackageReference=S8-8, PackageVersion="Rev. G, 03/2012", Packing="Tape and Reel", PartNumber=LTC1710IS8#TRPBF, RoHS=TRUE
U6: library part CMP-209535-000001-1, "LDO Voltage Regulators 1A, 3.3V", Dropout Voltage=1.1V, Manufacturer="Advanced Monolithic Systems", Max Junction Temp=+125°C, Max Power Dissipation=1.2W, Max Supply Voltage=15V, Nominal Supply Current=5mA, Output Current=1A, Output Voltage=3.3V, Package=AMS1117, Temperature="-40°C to +125°C", Temperature Range Low=-40°C, Automotive=No, Category=IC, ComponentLink2Description=Datasheet, ComponentLink2URL=http://www.advanced-monolithic.com/pdf/ds1117.pdf, Device Class L1="Integrated Circuits (ICs)", Device Class L2="Power Management ICs", Device Class L3="Voltage Regulators - Linear", Height=1.8mm, Ipc Land Pattern Name=SOT229P700X180-4, Lead Free=Yes, Manufacturer Part Number=AMS1117-3.3, Number Of Outputs=1, Octopart=https://octopart.com/ams1117-3.3-advanced+monolithic+systems-25899300, Output Type=Fixed, RoHS=TRUE, Standoff Height=0.64mm, Temperature Range High=+125°C
U7: library part CMP-1753-00002-2, "3-Axis Gyroscope, Accelerometer and a Digital Motion Processor(TM) (DMP), 2.375 to 3.46 V, -40 to 85 degC, 24-Pin QFN, RoHS, Tape and Reel", Manufacturer=InvenSense, Standard Package=5,000, Category=Sensors,Transducers, Datasheet URL=http://datasheet.octopart.com/MPU-6050-InvenSense-datasheet-14421344.pdf, Datasheet Version="Rev. 3.3, 05/2012", Dynamic Catalog=MPU-6000™Series, Family=Multifunction, Featured Product=MPU-60506-Axis,IntegratedI²CSolution, Manufacturer URL=http://www.invensense.com/, Online Catalog=MPU-6000™Series, Other Names="1428-1007-2 / MPU6050", Output Type=Digital, Sensor Type=MotionTracking, Unit PriceUSD=Digital
U8: library part CMP-0253-00590-1, "Fan-Speed Regulator and Monitor with I2C / SMBus Interface, -40 to 85 degC, 10-Pin SOP (U10+2), Pb-Free", Generic Part Number=MAX6650, Code_JEDEC=MO-187, ComponentLink1Description="Manufacturer URL", ComponentLink1URL=http://www.maximintegrated.com/, ComponentLink2Description=Datasheet, ComponentLink2URL=http://datasheets.maximintegrated.com/en/ds/MAX6650-MAX6651.pdf, ComponentLink3Description="Package Specification", ComponentLink3URL=http://pdfserv.maximintegrated.com/package_dwgs/21-0061.PDF, DatasheetVersion="Rev. 4", Fan Cntrl.=Linear, Interface=2-Wire/I2C/SMBus, Mounting Technology="Surface Mount", PackageDescription="10-Pin Micro-MAX, Thin Shrink Small-Outline (U10+2), Body 3 x 3 mm, Pitch 0.5 mm", PackageReference=U10+2, PackageVersion="Rev. L, 07/2008", PartNumber=MAX6650EUB+
U9: library part CMP-2000-05075-4, "IMU ACCEL/GYRO/MAG I2C 28LGA", Case/Package=LGA, Max Operating Temperature=85°C, Min Operating Temperature=-40°C, Lead Free="Lead Free", Mount="Surface Mount", Output Type=I2C, Packaging="Tape and Reel", Sensor Type=Accelerometer
U10: library part CMP-12177-000012-1, "CONSUMER MEMS", Manufacturer=STMicroelectronics, Max Supply Voltage=3.6V, Min Supply Voltage=1.62V, Operating Supply Current=0.55mA, Package=LGA-14L-DM00249496, Temperature="-40°C to +85°C", Temperature Range High=+85°C, Temperature Range Low=-40°C, Accel Range=2/4/8/16g, Automotive=No, Category=IC, ComponentLink2Description=Datasheet, ComponentLink2URL=https://www.st.com/resource/en/datasheet/lsm6dso.pdf, Device Class L1=Sensors, Device Class L2="Motion Sensors", Device Class L3="Inertial Measurement Units (IMUs)", Digikey Description="CONSUMER MEMS", Footprint Url=https://www.st.com/content/ccc/resource/technical/document/technical_note/73/17/9c/16/dd/96/4a/01/CD00134799.pdf/files/CD00134799.pdf/jcr:content/translations/en.CD00134799.pdf, Gyro Range=125/250/500/1000/2000°/s, Height=0.86mm, Lead Free=Yes, Manufacturer Part Number=LSM6DSOTR, Mouser Description="iNEMO inertial module: \"always-on\" integrated 3D accelerometer and 3D gyroscope", Octopart=https://octopart.com/lsm6dsotr-stmicroelectronics-81706672, RoHS=TRUE, Sensor Output=I2C,SPI, Sensor Type=Temperature,Accelerometer,Gyroscope

## Via types
v1: diameter 19.68, hole 7.87, Top Layer to Bottom Layer, 4 vias

## Nets (pads, with @x,y where several pads share a name; then routed paths per layer and width w, separated by ;. In a path a pad name is that pad's centre, name@x,y a point inside that pad or via, vN(x,y) a via of type N, cw(c..) or ccw(c..) an arc to the next point about the centre after c; other vN are vias at no path point)
3V3_SYS: C1.1 C2.1 C3.1 C4.1 C5.1 C7.1 C9.2 C12.1 C15.1 C18.1 C19.1 P1.2 R2.2 R3.2 R4.2 R8.2 R9.2 R22.2 R26.2 U1.8 U2.8 U3.4 U3.5 U4.3 U4.4 U5.1 U5.8 U6.2 U6.4 U7.8 U7.13 U8.9 U9.3 U9.6 U9.28 U10.5 U10.8 U10.12
5V: C6.1 C8.2 C10.1 FB1.1 P1.1 P2.1 R20.2 U6.3
5V_M: C11.1 FB1.2 J1.2
\A\L\E\R\T\: U8.7
\F\U\L\L\_\O\N: U8.6
GND: C1.2 C2.2 C3.2 C4.2 C5.2 C6.2 C7.2 C8.1 C9.1 C10.2 C11.2 C12.2 C13.1 C14.2 C15.2 C16.1 C17.2 C18.2 C19.2 D1.1 D2.1 D3.1 D4.1 J1.4 J1.5 P1.5 P2.5 Q1.4 Q1.8 SW1.B1 SW1.B2 SW2.B1 SW2.B2 U1.4 U2.4 U2.5 U2.6 U2.7 U3.2 U4.5 U4.7 U5.3 U5.4 U6.1 U7.1 U7.9 U7.11 U7.18 U8.2 U8.5 U9.2 U9.5 U9.17 U9.18 U9.25 U10.1 U10.2 U10.3 U10.6 U10.7
NetC13_2: C13.2 U7.20
NetC14_1: C14.1 U7.10
NetC16_2: C16.2 U9.9
NetC17_1: C17.1 J1.3 Q1.1 Q1.2 Q1.5 Q1.6 Q1.7 U8.10
NetD1_2: D1.2 R12.2
NetD2_2: D2.2 R13.2
NetD3_2: D3.2 R18.2
NetD4_2: D4.2 R19.2
NetJ1_1: J1.1 R20.1 U8.1
NetQ1_3: Q1.3 U8.8
NetR1_2: R1.2 U1.6
NetR5_2: R5.2 U1.7
NetR6_2: R6.2 U2.2
NetR7_2: R7.2 U2.1
NetR10_2: R10.2 U3.1
NetR11_2: R11.2 U3.6
NetR14_1: R14.1 U4.1
NetR15_1: R15.1 U4.6
NetR16_2: R16.2 U5.5
NetR17_2: R17.2 U5.6
NetR21_2: R21.2 U7.23
NetR22_1: R22.1 R27.2
NetR23_2: R23.2 U7.24
NetR24_2: R24.2 U8.4
NetR25_2: R25.2 U8.3
NetR26_1: R26.1 R28.2
NetR27_1: R27.1 U9.4
NetR28_1: R28.1 U9.11
NetR29_2: R29.2 U10.13
NetR30_2: R30.2 U10.14
O\V\E\R\T\E\M\P\_\A\L\E\R\T\: P2.4 R2.1 U2.3 U3.3 U4.2
OUT0: R18.1 U5.2
OUT1: R19.1 U5.7
P0: SW1.A1 SW1.A2 U1.1
P1: SW2.A1 SW2.A2 U1.2
P2: U1.3
P3: R12.1 U1.5
P4: R13.1
SCL: P1.4 R9.1 U9.19
SDA: P1.3 R8.1 U9.20
SMBCK: P2.3 R1.1 R4.1 R6.1 R10.1 R14.2 R16.1 R21.1 R24.1 R29.1
SMBDA: P2.2 R3.1 R5.1 R7.1 R11.1 R15.2 R17.1 R23.1 R25.1 R30.1
pads on no net: U7.2 U7.3 U7.4 U7.5 U7.6 U7.7 U7.12 U7.14 U7.15 U7.16 U7.17 U7.19 U7.21 U7.22 U7.25 U9.1 U9.7 U9.8 U9.10 U9.12 U9.13 U9.14 U9.15 U9.16 U9.21 U9.22 U9.23 U9.24 U9.26 U9.27 U10.4 U10.9 U10.10 U10.11
copper on no net:
  other v1: 12723.35,1493.35 12766.65,1493.35 12723.35,1536.65 12766.65,1536.65